# Altium PCB ADM32F036A2Q_BLDC_Demo_Rev1.0.pcbdoc (part 1 of 2)
Units mm, origin at the board's own origin, x right, y up, seen from the top; angles counter-clockwise.
Board outline 100 x 60 mm, 4 copper layers (Top Layer, S1, S2, Bottom Layer), stack 0.778 mm thick; 149 components, 80 nets, 408 pads, 387 vias.
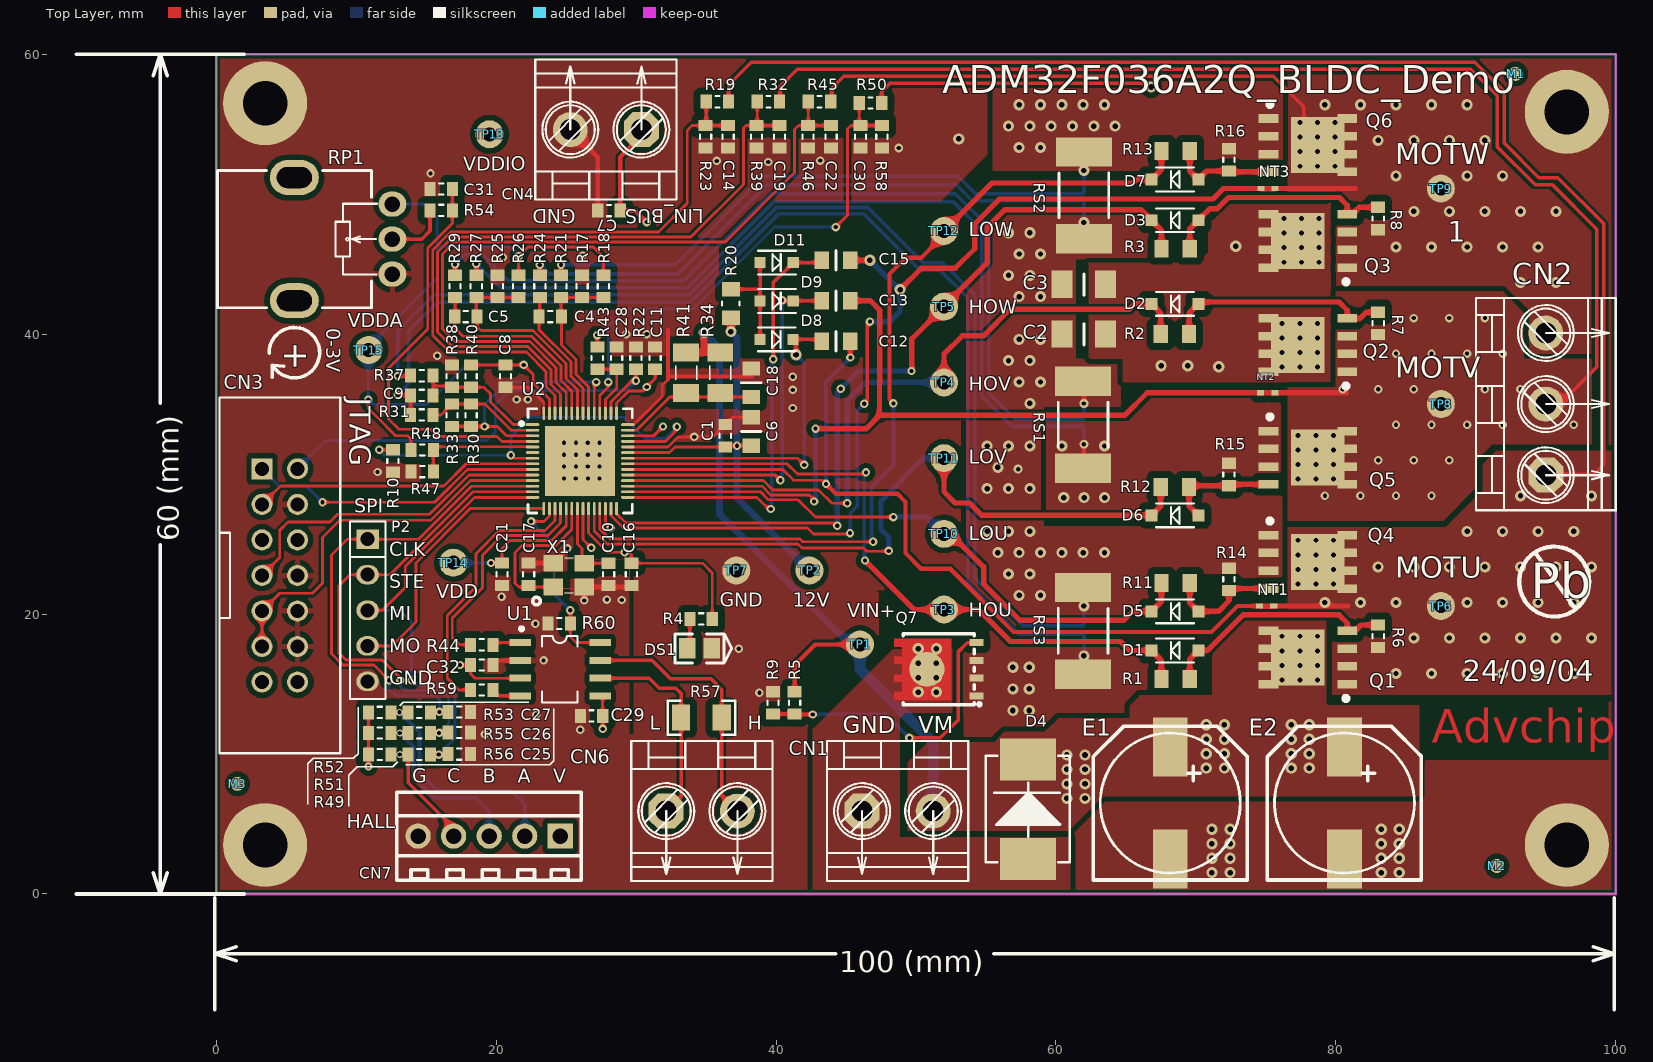
[diagram p0: Top Layer view]
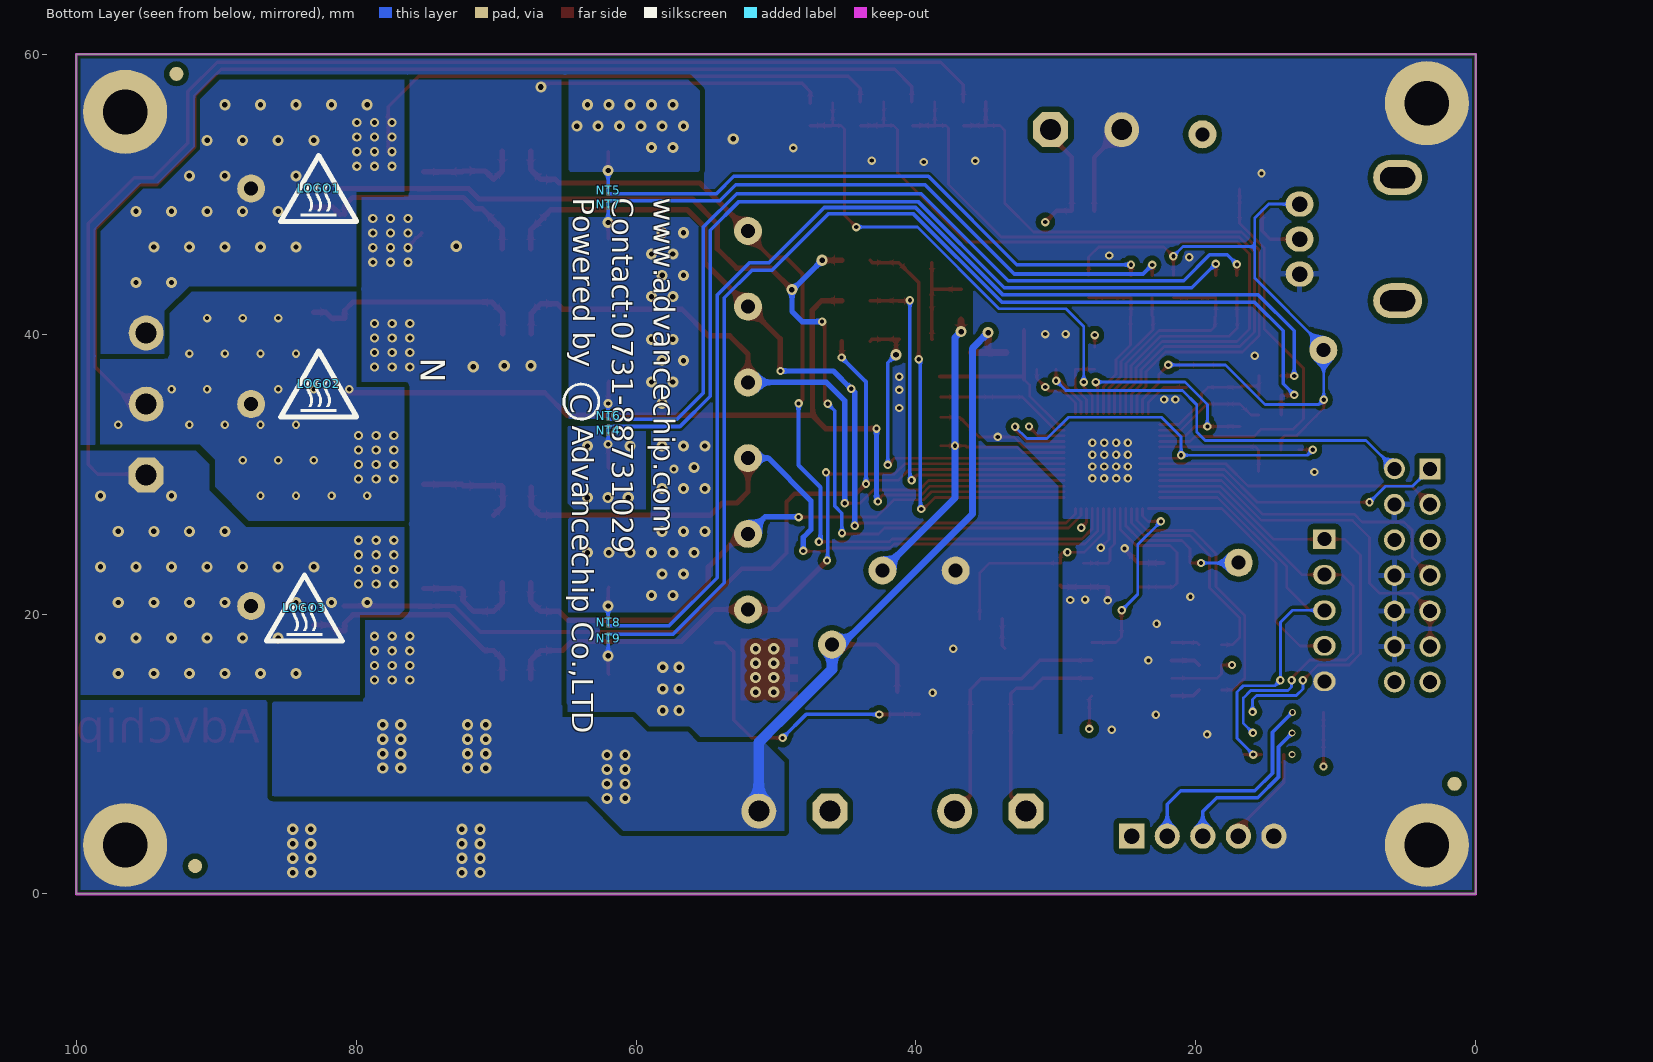
[diagram p1: Bottom Layer view, seen from below]
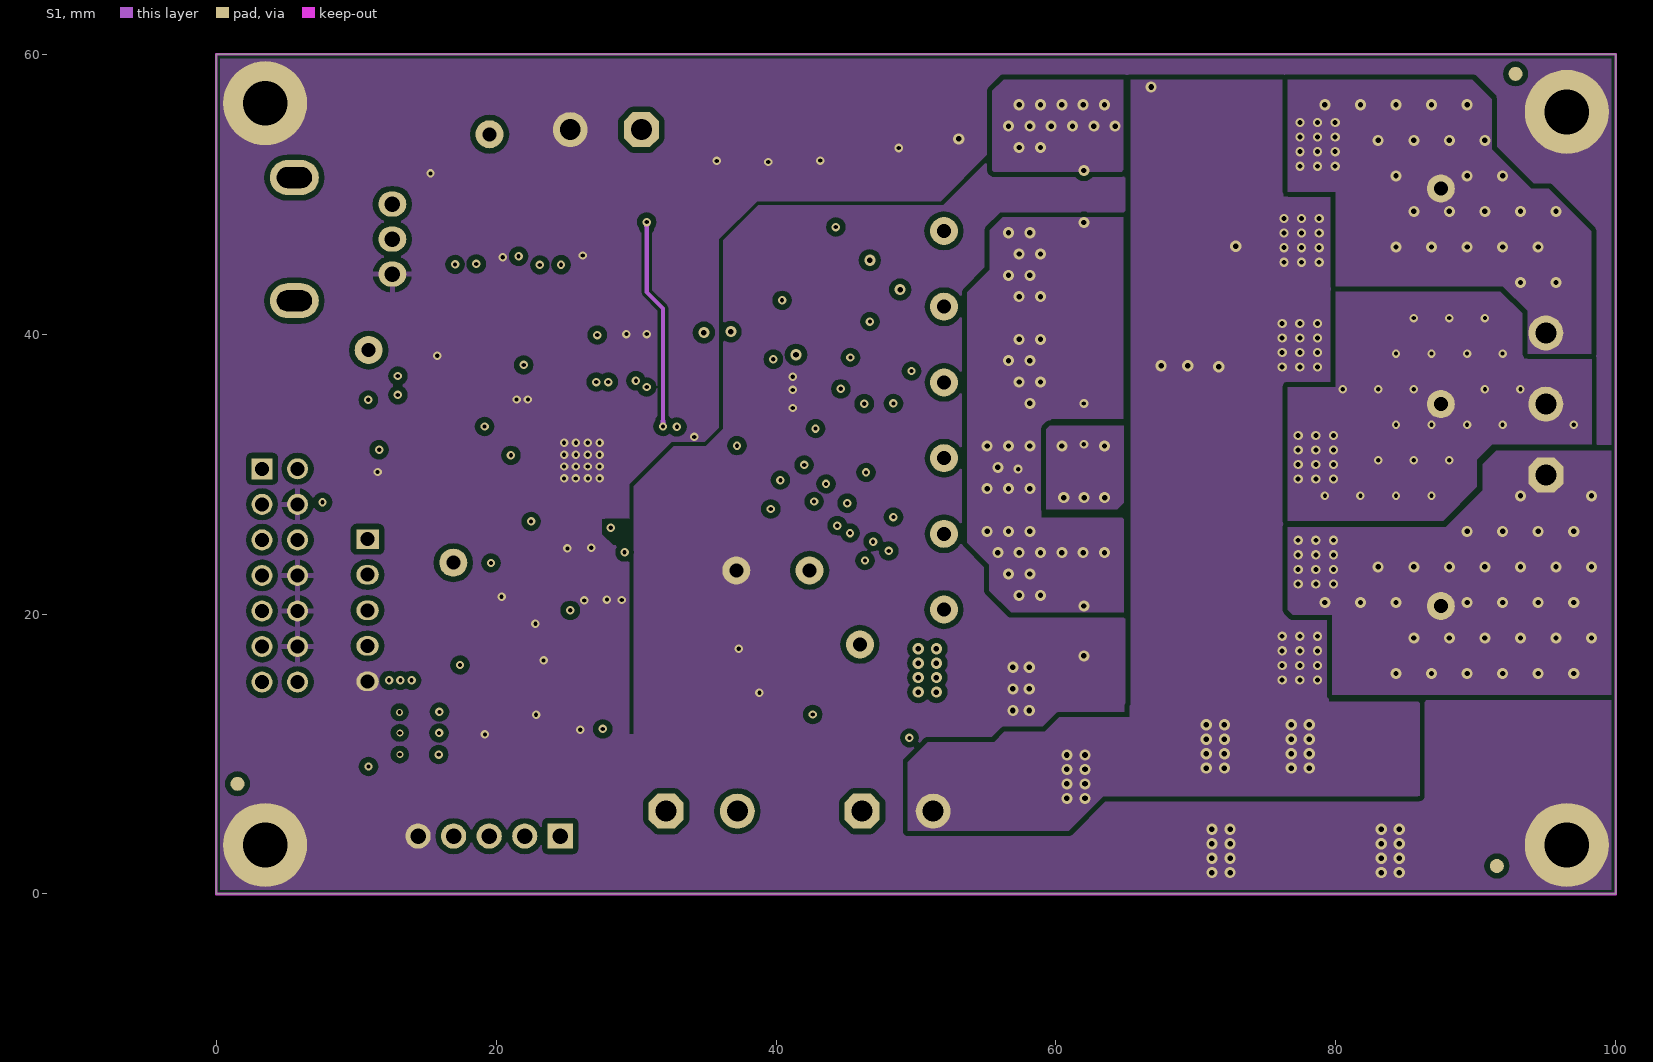
[diagram p2: S1]
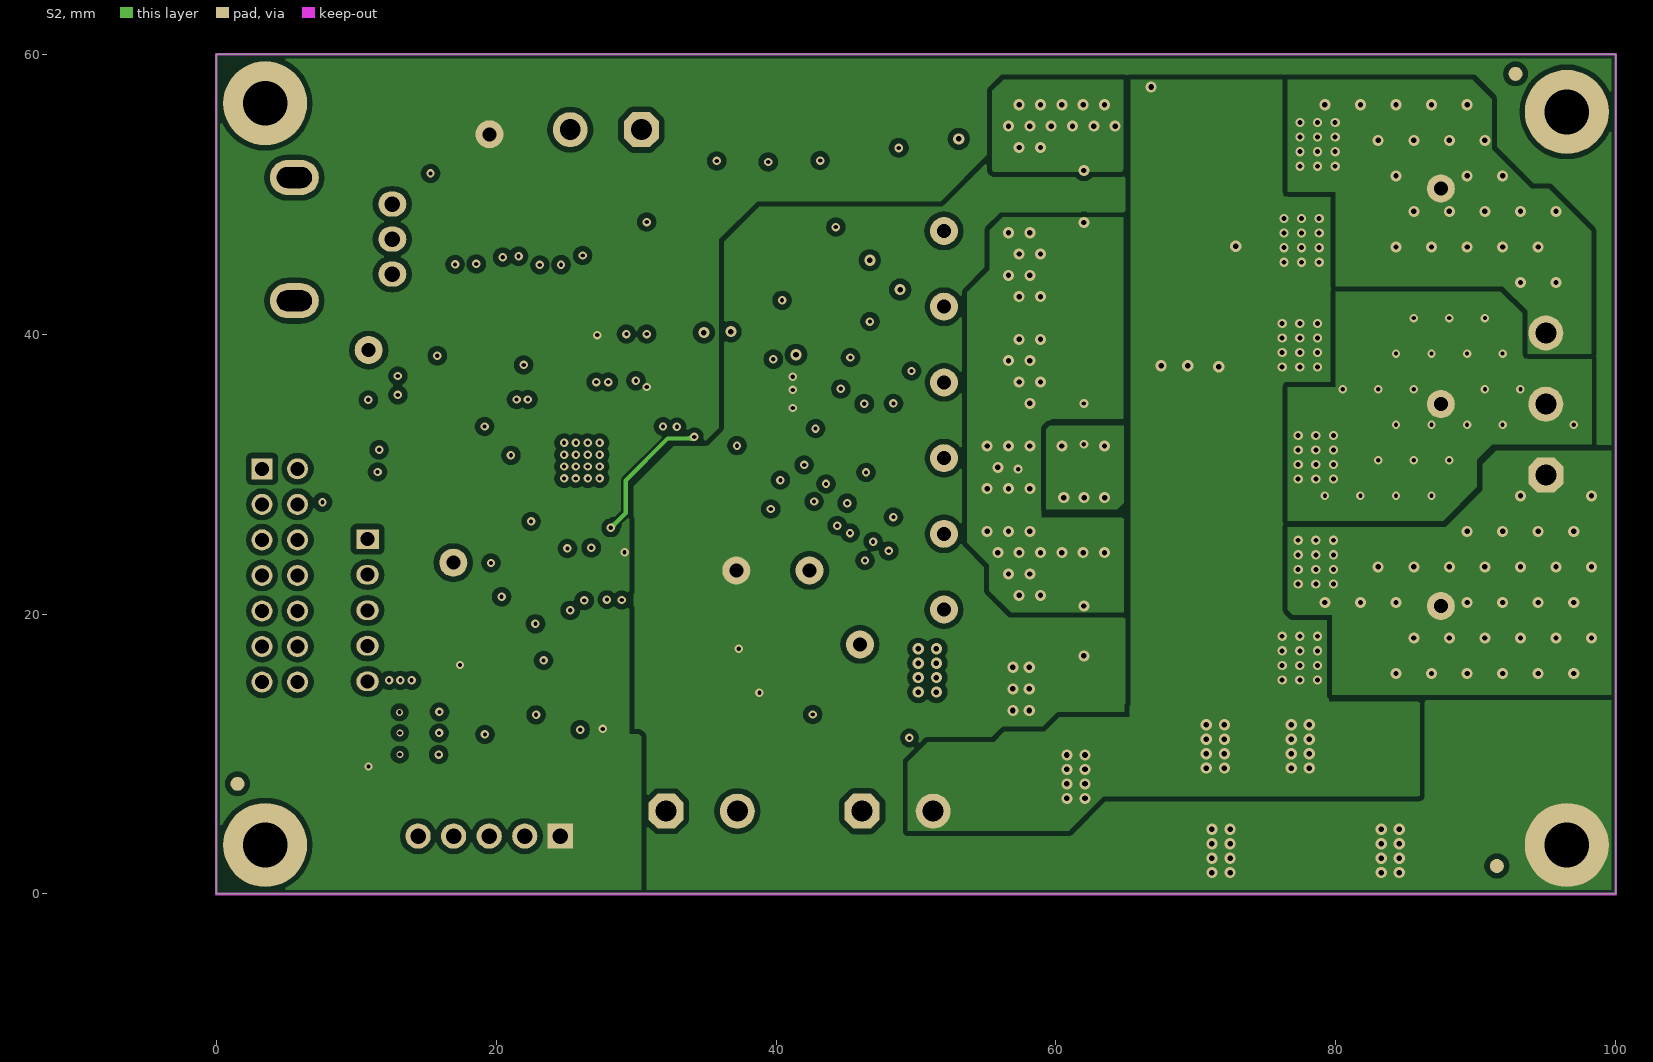
[diagram p3: S2]
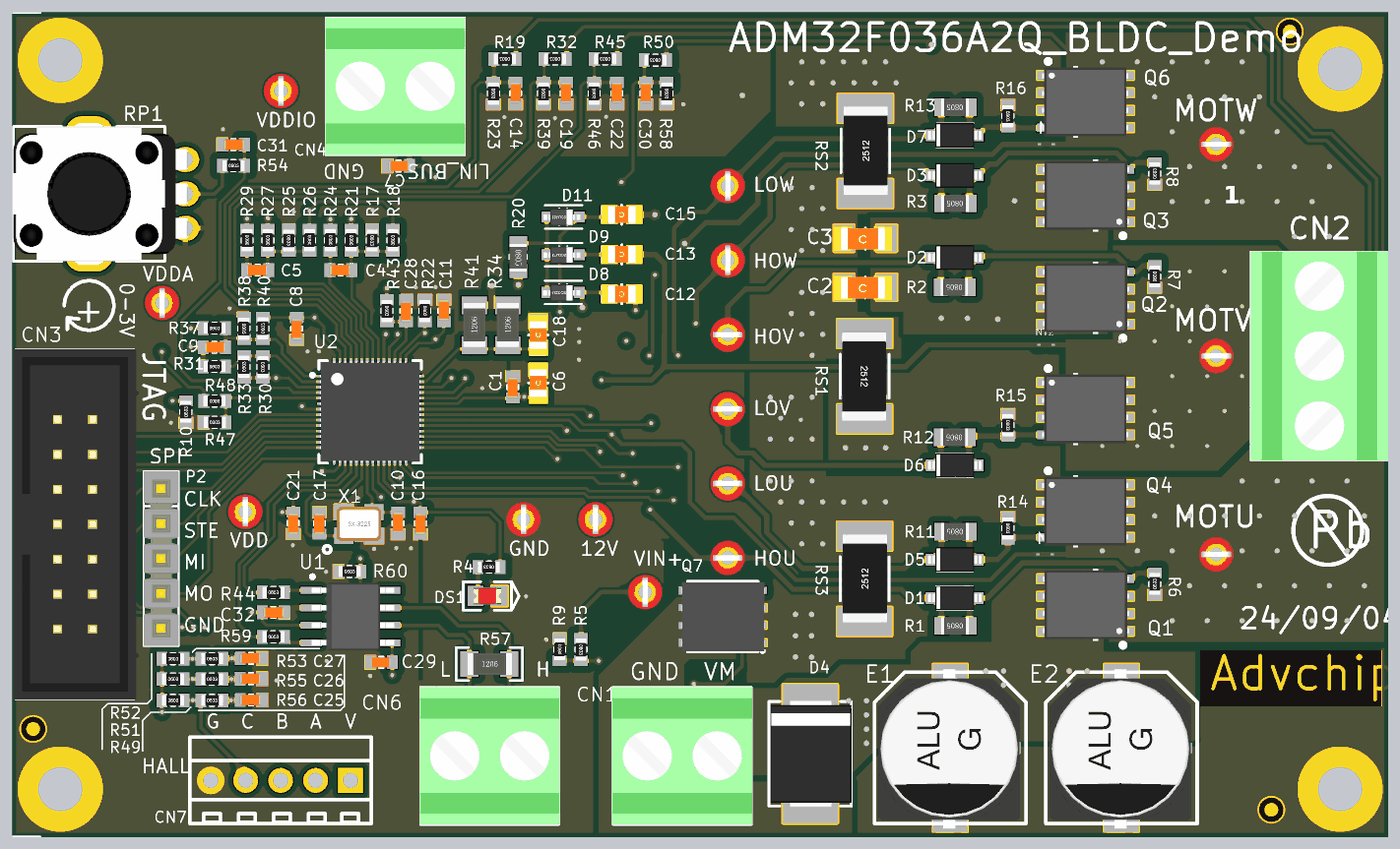
[diagram p5: 3D render of the assembled board from above, using the file's embedded part models]
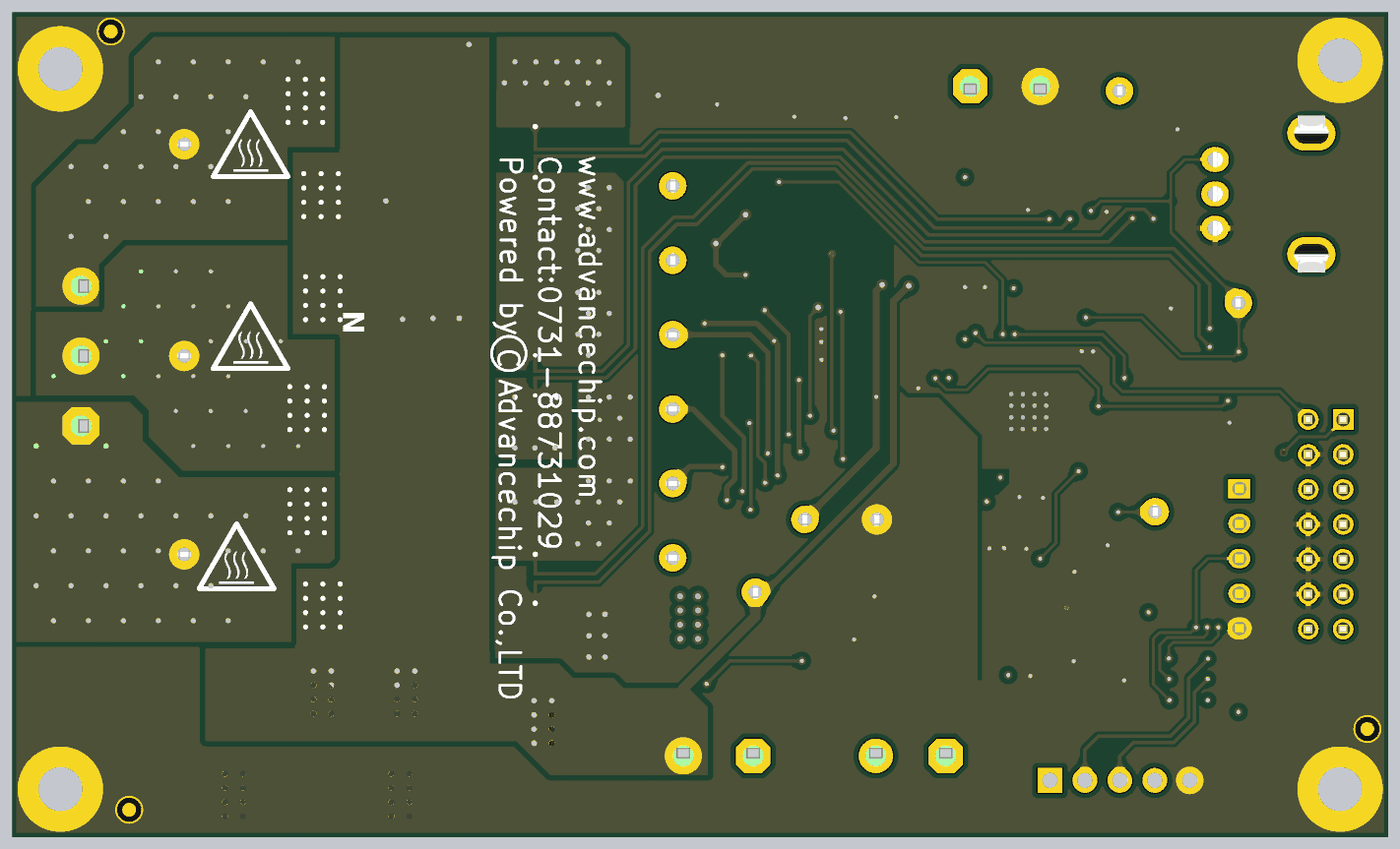
[diagram p6: 3D render of the assembled board from below, using the file's embedded part models]

## Layer stack, top to bottom
Top Solder: solder mask 0.0102, Solder Resist, Dk 3.5
Top Layer: signal copper 0.0356
Dielectric 1: core 0.254, FR-4, Dk 4.2
S1: signal copper 0.036
Dielectric 3: prepreg 0.127, Dk 4.2
S2: signal copper 0.036
Dielectric 2: core 0.254, Dk 4.2
Bottom Layer: signal copper 0.0356
Bottom Solder: solder mask 0.0102, Solder Resist, Dk 3.5

## Board outline
0,0 100,0 100,60 0,60

## Design rules (kind name [scope] priority, off if disabled: settings)
Clearance Clearance_U1 [InComponent('U1')] p1: gap=0.152 ignorepadtopadclearanceinfootprint=FALSE except(0.381: SMDPad-Fill SMDPad-Poly SMDPad-Region)
Clearance Clearance_T1T2 [(InComponent('T1') OR InComponent('T2'))] p2: gap=0.152 ignorepadtopadclearanceinfootprint=FALSE except(0.254: SMDPad-Fill SMDPad-Poly SMDPad-Region)
Clearance [All] p3: gap=0.203 ignorepadtopadclearanceinfootprint=FALSE except(0.152: Arc-Arc Arc-Track Arc-SMDPad Track-Track Track-SMDPad SMDPad-SMDPad; 0.381: THPad-Fill THPad-Poly THPad-Region Via-Fill Via-Poly Via-Region Fill-Fill Fill-Poly Fill-Region Poly-Poly Poly-Region Region-Region; 0.508: SMDPad-Fill SMDPad-Poly SMDPad-Region)
HoleSize [All] p1: absolutevalues=TRUE maxlimit=20 minlimit=0.025 maxpercent=80.000 minpercent=20.000
MinimumSolderMaskSliver [All] p1: minsoldermaskwidth=0.025
PlaneClearance [All] p1: clearance=0.254
PlaneConnect [InNet('GND')] p1: planeconnectstyle=Relief reliefexpansion=0.508 reliefentries=4 reliefconductorwidth=0.254 reliefairgap=0.254
PolygonConnect PolygonConnect_PAD [(HasFootprint('J-DG128-5') OR HasFootprint('SIP8A') OR HasFootprint('IDC14-L') OR HasFootprint('SIP6A') OR HasFootprint('SO-8') OR HasFootprint('SIP3A') OR HasFootprint('RK09K1130'))] p1: thpad.connectstyle=Relief thpad.reliefconductorwidth=0.381 thpad.reliefentries=4 thpad.polygonreliefangle="90 Angle" thpad.airgapwidth=0.381 smdpad.connectstyle=Relief smdpad.reliefconductorwidth=0.381 smdpad.reliefentries=4 smdpad.polygonreliefangle="90 Angle" smdpad.airgapwidth=0.381 via.connectstyle=Direct via.reliefconductorwidth=0.254 via.reliefentries=4 via.polygonreliefangle="90 Angle" via.airgapwidth=0.254
PolygonConnect [All] p2: connectstyle=Direct reliefconductorwidth=0.254 reliefentries=4 polygonreliefangle="90 Angle" airgapwidth=0.254
RoutingVias [All] p1: holewidth=0.711 width=1.27 viastyle="Through Hole" minholewidth=0.3 minwidth=0.6 maxholewidth=0.711 maxwidth=1.27
SilkToBoardRegionClearance [All] p1 off:
SilkToSilkClearance [All] p1 off: silktosilkclearance=0.254
SilkToSolderMaskClearance [IsPad] p1 off: minsilkscreentomaskgap=0.254 clearancetoexposedcopper=TRUE
SolderMaskExpansion [All] p1: expansion=0.102
Width [All] p1: maxlimit=25.4 minlimit=0.2 preferedwidth=0.2 minimp=50.000000 maximp=50.000000 favimp=50.000000
23 further rules are at their usual default settings.

## Components (designator, comment, footprint, x,y, rotation, side; value= is the part's Value field where it differs from the comment)
C1 "0.1uF/50V" C0603 36.373,32.741 r270 top value="TDK C3216X7R1V106KT000E"
C2 "1uF/50V" C1206 62,40.005 r180 top value=1uF
C3 "1uF/50V" C1206 62,43.561 r180 top value=1uF
C4 "NC" C0603 23.876,41.25 r180 top
C5 "NC" C0603 17.844,41.25 r180 top
C6 "10uF/50V" C0805 38.227,33.045 r90 top
C7 "100pF" C0603 28.067,48.819 r0 top
C8 "2.2uF/25V" C0603 20.676,36.999 r270 top value=2.2uF
C9 "100pF/50V" C0603 14.693,35.63 r0 top
C10 "22pF/50V" C0603 28.042,22.835 r90 top value=100pF
C11 "2.2uF/25V" C0603 31.369,38.289 r90 top value=2.2uF
C12 "2.2uF/50V" C0805 44.291,39.497 r180 top
C13 "2.2uF/50V" C0805 44.291,42.386 r180 top
C14 "47nF/25V" C0603 36.576,54.102 r90 top value=47nF
C15 "2.2uF/50V" C0805 44.291,45.276 r180 top
C16 "2.2uF/25V" C0603 29.667,22.835 r270 top value=2.2uF
C17 "22pF/50V" C0603 22.327,22.847 r270 top value=100pF
C18 "10uF/50V" C0805 38.227,36.525 r90 top
C19 "47nF/25V" C0603 40.246,54.102 r90 top value=47nF
C21 "2.2uF/25V" C0603 20.422,22.847 r270 top value=2.2uF
C22 "47nF/25V" C0603 43.942,54.102 r90 top value=47nF
C25 "10nF/50V" C0603 17.361,9.986 r180 top
C26 "10nF/50V" C0603 17.361,11.532 r180 top
C27 "10nF/50V" C0603 17.361,13.007 r180 top
C28 "0.1uF/50V" C0603 28.609,38.289 r270 top value="TDK C3216X7R1V106KT000E"
C29 "0.1uF/50V" C0603 26.822,12.725 r180 top value=0.1uF
C30 "0.1uF/50V" C0603 46.041,54.102 r90 top
C31 "0.1uF/50V" C0603 16.078,50.368 r0 top value="TDK C3216X7R1V106KT000E"
C32 "0.1uF/50V" C0603 18.974,16.358 r0 top value=0.1uF
CN1 "EK508V-02P" J-EK508V-02P 48.692,5.918 r0 top
CN2 "EK508V-03P" J-EK508V-03P 95,35 r90 top
CN3 "2.54-2X7P" IDC14-L 4.547,22.758 r270 top
CN4 "EK508V-02P" J-EK508V-02P_1 27.838,54.61 r180 top
CN6 "EK508V-02P" J-EK508V-02P 34.696,5.918 r0 top
CN7 "J-DG128-5" DB125-2.54-5P 19.507,4.135 r180 top
D1 "1N4148W" sod-123 68.5,17.399 r180 top
D2 "1N4148W" sod-123 68.5,42.164 r180 top
D3 "1N4148W" sod-123 68.5,48.133 r180 top
D4 "SMCJ26CA" SMC 57.988,6.071 r270 top
D5 "1N4148W" sod-123 68.5,20.193 r180 top
D6 "1N4148W" sod-123 68.5,27.051 r180 top
D7 "1N4148W" sod-123 68.5,51.054 r180 top
D8 "1N4148WS" SOD-323 40.03,39.624 r180 top
D9 "1N4148WS" SOD-323 40.044,42.367 r180 top
D11 "1N4148WS" SOD-323 40.044,45.11 r180 top
DS1 "绿色LED" SMD_LED0805_LED 34.535,17.545 r180 top
E1 "100uF/50V" CAP_SMD10*10 68.167,6.5 r270 top
E2 "100uF/50V" CAP_SMD10*10 80.613,6.5 r270 top
LOGO1 "CAUTION HOT SURFACE" IEC_HotSurface_Small 82.677,50.419 r180 bottom
LOGO2 "CAUTION HOT SURFACE" IEC_HotSurface_Small 82.677,36.449 r180 bottom
LOGO3 "CAUTION HOT SURFACE" IEC_HotSurface_Small 83.693,20.447 r180 bottom
M1 "" Mark1 92.837,58.598 r0 top
M2 "" Mark1 91.5,2 r0 top
M3 "" Mark1 1.524,7.874 r0 top
NT1 "Net-Tie" Net-Tie_15mil 75.057,20.574 r0 top net-tie
NT2 "Net-Tie" Net-Tie_15mil 75.133,35.814 r0 top net-tie
NT3 "Net-Tie" Net-Tie_15mil 75.152,50.4 r0 top net-tie
NT4 "Net-Tie" Net-Tie_10mil#1 62.001,33.147 r270 bottom net-tie
NT5 "Net-Tie" Net-Tie_10mil#1 62,50.292 r90 bottom net-tie
NT6 "Net-Tie" Net-Tie_10mil#2 62.001,34.163 r270 bottom net-tie
NT7 "Net-Tie" Net-Tie_10mil#1 62,49.276 r270 bottom net-tie
NT8 "Net-Tie" Net-Tie_10mil#1 62,19.431 r90 bottom net-tie
NT9 "Net-Tie" Net-Tie_10mil#1 62,18.288 r270 bottom net-tie
P2 "XH2.54-5P母座" SIP5 10.82,25.349 r270 top
Q1 "AD65N10" "POWER 56" 78,16.891 r90 bottom
Q2 "AD65N10" "POWER 56" 78,39.219 r90 bottom
Q3 "AD65N10" "POWER 56" 78,46.662 r90 bottom
Q4 "AD65N10" "POWER 56" 78,23.729 r270 bottom
Q5 "AD65N10" "POWER 56" 78,31.172 r270 bottom
Q6 "AD65N10" "POWER 56" 78,53.5 r270 bottom
Q7 "YJG150N03A" DFN5*6 52.556,16.053 r90 top
R1 "22R" R0805 68.548,15.367 r180 top value=1K
R2 "22R" R0805 68.5,40.005 r180 top value=1K
R3 "22R" R0805 68.548,46.101 r180 top value=1K
R4 "4.7KΩ" R0603 34.648,19.653 r180 top value=1K
R5 "10KΩ" R0603 41.335,13.655 r270 top value=1K
R6 "10KΩ" R0603 83.026,18.415 r90 top
R7 "10KΩ" R0603 83.026,40.767 r90 top
R8 "10KΩ" R0603 83.026,48.26 r90 top
R9 "100KΩ" R0603 39.786,13.655 r90 top value=1K
R10 "2.2K" R0603 12.624,30.937 r90 top
R11 "22R" R0805 68.548,22.225 r180 top value=1K
R12 "22R" R0805 68.5,29.083 r180 top value=1K
R13 "22R" R0805 68.548,53.086 r180 top value=1K
R14 "10KΩ" R0603 72.358,22.479 r270 top
R15 "10KΩ" R0603 72.358,29.972 r270 top
R16 "10KΩ" R0603 72.358,52.451 r270 top
R17 "18K" R0603 26.153,43.411 r270 top value=1K
R18 "18K" R0603 27.667,43.411 r90 top value=1K
R19 "150KΩ 1%" R0603 35.814,56.604 r180 top
R20 "20R" R0805 36.779,42.189 r270 top
R21 "3K" R0603 24.639,43.411 r90 top value=1K
R22 "2.2KΩ" R0603 29.989,38.289 r270 top value=1K
R23 "10KΩ 1%" R0603 34.97,54.102 r270 top
R24 "0R" R0603 23.125,43.411 r90 top value=1K
R25 "18K" R0603 20.097,43.411 r270 top value=1K
R26 "18K" R0603 21.611,43.411 r90 top value=1K
R27 "3K" R0603 18.583,43.411 r90 top value=1K
R29 "0R" R0603 17.069,43.411 r90 top value=1K
R30 "100KΩ" R0603 18.217,34.205 r270 top value=1K
R31 "1KΩ" R0603 14.693,34.233 r0 top value=1K
R32 "150KΩ 1%" R0603 39.459,56.604 r180 top
R33 "10KΩ" R0603 16.845,34.205 r90 top value=1K
R34 "0R" R1206 36.017,37.236 r90 top
R37 "1KΩ" R0603 14.693,37.027 r0 top value=1K
R38 "10KΩ" R0603 16.845,36.999 r270 top value=1K
R39 "10KΩ 1%" R0603 38.608,54.102 r270 top
R40 "100KΩ" R0603 18.217,36.999 r90 top value=1K
R41 "0R" R1206 33.579,37.236 r90 top
R43 "10K" R0603 27.229,38.289 r270 top
R44 "100R" R0603 18.974,17.805 r0 top
R45 "150KΩ 1%" R0603 43.105,56.604 r180 top
R46 "10KΩ 1%" R0603 42.291,54.102 r270 top
R47 "NC" R0603 14.718,30.175 r0 top value=1K
R48 "NC" R0603 14.718,31.725 r180 top value=1K
R49 "4.7KΩ" R0603 11.684,9.96 r0 top value=1K
R50 "150KΩ 1%" R0603 46.75,56.515 r180 top
R51 "4.7KΩ" R0603 11.684,11.506 r0 top value=1K
R52 "4.7KΩ" R0603 11.684,12.982 r0 top value=1K
R53 "1KΩ" R0603 14.516,12.982 r0 top value=1K
R54 "1KΩ" R0603 16.078,48.844 r0 top value=1K
R55 "1KΩ" R0603 14.516,11.506 r0 top value=1K
R56 "1KΩ" R0603 14.516,9.96 r0 top value=1K
R57 "120R" 1206RX 34.671,12.598 r0 top
R58 "10KΩ 1%" R0603 47.565,54.102 r270 top
R59 "100R" R0603 18.974,14.58 r0 top
R60 "10K" R0603 24.511,19.329 r0 top value=1K
RP1 "RK09K1130AAU  50KΩ" RK09K1130 5.588,46.787 r90 top
RS1 "50mΩ/3W" R2512 61.944,33.528 r90 top value=1K
RS2 "50mΩ/3W" R2512 62,49.911 r270 top value=1K
RS3 "5mΩ/3W" R2512 61.944,18.796 r270 top value=1K
TP1 "VIN+" TP-5000-RED 45.999,17.831 r0 top
TP2 "12V" TP-5000-RED 42.393,23.114 r0 top
TP3 "HOU" TP-5000-RED 52,20.32 r90 top
TP4 "HOV" TP-5000-RED 52,36.551 r90 top
TP5 "HOW" TP-5000-RED 52,41.961 r0 top
TP6 "MOTU" TP-5000-RED 87.5,20.574 r90 top
TP7 "GND" TP-5000-RED 37.16,23.114 r0 top
TP8 "MOTV" TP-5000-RED 87.5,35 r90 top
TP9 "MOTW" TP-5000-RED 87.5,50.4 r90 top
TP10 "LOU" TP-5000-RED 52,25.73 r90 top
TP11 "LOV" TP-5000-RED 52,31.14 r90 top
TP12 "LOW" TP-5000-RED 52,47.371 r0 top
TP13 "VDDIO" TP-5000-RED 19.533,54.28 r0 top
TP14 "VDD" TP-5000-RED 16.942,23.673 r0 top
TP15 "VDDA" TP-5000-RED 10.897,38.862 r0 top
U1 "MCP2562FD-E/SN" SO-8 24.587,16.053 r270 top
U2 "ADM32F036A2Q" QFN56-7X7-04P 26.01,30.937 r0 top
X1 "10MHz" XTAL_3225 25.197,22.784 r0 top

## Footprints (in the part's own frame and the unit in brackets; to place one, negate y for a bottom-side part, rotate by r counter-clockwise, add the part's x,y. Pads: shape width x height; smd on the part's side, far side on the other; paste and mask are expansions set on the pad)
1206RX [mm]
  rect 1.3x1.85 smd: 1(-1.45,0) 2(1.45,0)
  silkscreen extent -2.4,-1.21 2.4,1.21, body extent -1.57,-0.8 1.63,0.8, height 0.6
C0603 [mm]
  rect 0.8x1 smd mask+0.051: 1(-0.8,0) 2(0.8,0)
  silkscreen extent -0.15,-0.4 0.15,0.4, body extent -0.71,-0.38 0.81,0.38, height 0.68
C0805 [mil]
  rect 40x50 smd: 1(-40,0) 2(40,0)
  silkscreen extent 0,-28 0,28, body extent -59,-28 59,27, height 37
C1206 [mm]
  rect 1.5x1.95 smd: 1(-1.55,0) 2(1.55,0)
  silkscreen extent 0,-0.74 0,0.79, body extent -1.92,-0.86 2.28,0.94, height 0.95
CAP_SMD10*10 [mm] "10*10"
  rect 4.2x2.5 smd: 1(-4,0) 2(4,0)
  silkscreen extent -5.5,-5.5 5.5,5.5, body extent -5.72,-5.23 5.88,5.07, height 10.2
DB125-2.54-5P [mm]
  rect 1.8x1.8 hole 1.1: 1(-5.08,0)
  round 1.8 hole 1.1: 2(-2.54,0) 3(0,0) 4(2.54,0) 5(5.08,0)
  silkscreen extent -6.59,-3.14 6.59,3.14
DFN5*6 [mm] "USED for CTN04PN035"
  rect 0.498x1.001 smd: 1(1.905,-1.775) 2(-1.905,-1.775) 2(-0.635,-1.775) 2(0.635,-1.775)
  round 2.5 smd: 3(0,1.775)
  Top Layer region: -2.2,0.025 -2.2,4.125 -1.6,4.125 -1.6,3.525 -0.9,3.525 -0.9,4.125 -0.4,4.125 -0.4,3.525 0.4,3.525 0.4,4.125 0.9,4.125 0.9,3.525 1.6,3.525 1.6,4.125 2.2,4.125 2.2,0.025
  silkscreen extent -2.6,-2.08 2.54,3.47, body extent -2.53,-2.16 2.47,3.94, height 0.95
IDC14-L [mm]
  rect 1.5x1.5 hole 1: 1(-7.62,-1.27)
  round 1.5 hole 1: 2(-7.62,1.27) 3(-5.08,-1.27) 4(-5.08,1.27) 5(-2.54,-1.27) 6(-2.54,1.27) 7(0,-1.27) 8(0,1.27) 9(2.54,-1.27) 10(2.54,1.27) 11(5.08,-1.27) 12(5.08,1.27) 13(7.62,-1.27) 14(7.62,1.27)
  silkscreen extent -12.7,-4.32 12.7,4.32, body extent -12.72,-4.44 12.72,4.67, height 9.1
IEC_HotSurface_Small [mm]
  silkscreen extent -2.72,-2.36 2.72,2.35
J-EK508V-02P [mm]
  oct 2.5x2.5 hole 1.5: 1(-2.54,0)
  round 2.5 hole 1.5: 2(2.54,0)
  silkscreen extent -5.04,-5 5.04,5, body extent -5.08,-5 5.08,5, height 13.8
J-EK508V-02P_1 [mm]
  oct 2.5x2.5 hole 1.5: 1(-2.54,0)
  round 2.5 hole 1.5: 2(2.54,0)
  silkscreen extent -5.04,-5 5.04,5, body extent -5.08,-5 5.08,5, height 13.8
J-EK508V-03P [mm]
  oct 2.5x2.5 hole 1.5: 1(-5.08,0)
  round 2.5 hole 1.5: 2(0,0) 3(5.08,0)
  silkscreen extent -7.58,-5 7.58,5, body extent -7.62,-5 7.62,5, height 13.8
Mark1 [mm] "基准点 无边框"
  round 1 all layers, no hole: 0(0,0)
Net-Tie_10mil#1 [mil] "10mil net tie, no solder mask opening, no solder paste"
  rect 10x10 smd paste-5 mask-5: 1(-10,0) 2(10,0)
  Top Layer region: -6,5 6,5 6,-5 -6,-5
Net-Tie_10mil#2 [mil]
  rect 10x10 smd paste-5 mask-5: 1(10,0) 2(-10,0)
  Top Layer region: 6,-5 -6,-5 -6,5 6,5
Net-Tie_15mil [mil] "网络连接点"
  rect 20x15 smd paste-5 mask-5: 1(-20,0) 2(20,0)
  Top Layer region: -20,7 20,7 20,-7 -20,-7
"POWER 56" [mm]
  rect 0.61x1.4 smd far side: 1(-1.905,2.816) 2(-0.635,2.816) 3(0.635,2.816) 4(1.905,2.816) 5(1.905,-2.816) 6(0.635,-2.816) 7(-0.635,-2.816) 8(-1.905,-2.816)
  rect 4x3.81 smd far side: 9(0,-0.716)
  body extent -2.61,-3.1 2.64,3.14, height 1.09
QFN56-7X7-04P [mm]
  rect 5x5 smd mask+0.051: 0(0,0)
  oval 0.95x0.2 smd mask+0.051: 1(-3.4,2.6) 2(-3.4,2.2) 3(-3.4,1.8) 4(-3.4,1.4) 5(-3.4,1) 6(-3.4,0.6) 7(-3.4,0.2) 8(-3.4,-0.2) 9(-3.4,-0.6) 10(-3.4,-1) 11(-3.4,-1.4) 12(-3.4,-1.8) 13(-3.4,-2.2) 14(-3.4,-2.6) 29(3.4,-2.6) 30(3.4,-2.2) 31(3.4,-1.8) 32(3.4,-1.4) 33(3.4,-1) 34(3.4,-0.6) 35(3.4,-0.2) 36(3.4,0.2) 37(3.4,0.6) 38(3.4,1) 39(3.4,1.4) 40(3.4,1.8) 41(3.4,2.2) 42(3.4,2.6)
  oval 0.2x0.95 smd mask+0.051: 15(-2.6,-3.4) 16(-2.2,-3.4) 17(-1.8,-3.4) 18(-1.4,-3.4) 19(-1,-3.4) 20(-0.6,-3.4) 21(-0.2,-3.4) 22(0.2,-3.4) 23(0.6,-3.4) 24(1,-3.4) 25(1.4,-3.4) 26(1.8,-3.4) 27(2.2,-3.4) 28(2.6,-3.4) 43(2.6,3.4) 44(2.2,3.4) 45(1.8,3.4) 46(1.4,3.4) 47(1,3.4) 48(0.6,3.4) 49(0.2,3.4) 50(-0.2,3.4) 51(-0.6,3.4) 52(-1,3.4) 53(-1.4,3.4) 54(-1.8,3.4) 55(-2.2,3.4) 56(-2.6,3.4)
  silkscreen extent -4.32,-3.72 3.73,3.73, body extent -3.65,-3.65 3.66,3.66, height 1
R0603 [mm] "无丝印 脚距1.6mm  0.8/1mm 焊盘"
  rect 0.8x1 smd mask+0.051: 1(-0.8,0) 2(0.8,0)
  silkscreen extent -0.15,-0.4 0.15,0.4, body extent -0.79,-0.4 0.81,0.4, height 0.43
R0805 [mil] "标准型  间距40mil"
  rect 40x50 smd: 1(-40,0) 2(40,0)
  body extent -38,-25 41,25, height 22
R1206 [mm]
  rect 1.3x1.85 smd: 1(-1.45,0) 2(1.45,0)
  silkscreen extent -0.5,-0.75 0.5,0.75, body extent -1.57,-0.8 1.63,0.8, height 0.6
R2512 [mm] "SMD, 2-Leads, Body 6.45x3.35mm, Pitch 6.2mm"
  rect 2.1x4 smd: 1(3.1,0) 2(-3.1,0)
  silkscreen extent -1.6,-1.78 1.6,1.78, body extent -3.23,-1.57 3.17,1.63, height 0.6
RK09K1130 [mm] "立式可调电位器"
  oval 2.5x3.5 hole 1.5 slot 2.5 at 90 deg: 0(-4.4,0) 0(4.4,0)
  oval 1.8x2 hole 1.1: 1(-2.5,-7) 2(0,-7) 3(2.5,-7)
  silkscreen extent -4.9,-5.88 4.9,5.5, body extent -5.7,-7.15 5.7,5.5, height 19.5
SIP5 [mm]
  rect 1.4x1.6 hole 1: 1(0,0)
  oval 1.4x1.6 hole 1: 2(2.54,0) 3(5.08,0) 4(7.62,0) 5(10.16,0)
  silkscreen extent -1.27,-1.27 11.43,1.27, body extent -1.27,-1.27 11.43,1.27, height 8.89
SMC [mm]
  rect 3x4 smd: 1(3.555,0) 2(-3.555,0)
  silkscreen extent -3.8,-3 3.8,3, body extent -3.9,-2.9 3.9,3, height 2.4
SMD_LED0805_LED [mm]
  rect 1.16x1.47 smd: 1(0.875,0) 2(-0.875,0)
  silkscreen extent -2.3,-1.04 1.76,1.03, body extent -1.01,-0.62 1.01,0.62, height 1.1
SO-8 [mil]
  rect 20x60 smd: 1(-75,-112.5) 2(-25,-112.5) 3(25,-112.5) 4(75,-112.5) 5(75,112.5) 6(25,112.5) 7(-25,112.5) 8(-75,112.5)
  silkscreen extent -119,-114 93,49, body extent -96,-111 96,125, height 64
sod-123 [mm]
  rect 0.85x0.85 smd: 1(-1.675,0) 2(1.675,0)
  silkscreen extent -1.35,-0.85 1.35,0.85, body extent -1.95,-0.9 1.95,0.9, height 1.18
SOD-323 [mm]
  rect 0.8x0.8 smd: A(1.18,0) K(-1.18,0)
  silkscreen extent -1.38,-0.85 1.32,0.85, body extent -1.25,-0.6 1.45,0.65, height 1.1
TP-5000-RED [mm] "KEYSTONE红色测试点"
  round 2 hole 1: 1(0,0)
  body extent -1.27,-1.27 1.27,1.27, height 4.89
XTAL_3225 [mm] "3225晶振"
  rect 1.4x1.2 smd mask+0.051: 1(-1.1,-0.85) 2(1.1,-0.85) 3(1.1,0.85) 4(-1.1,0.85)
  silkscreen extent -2.58,-2.12 0.3,1.25, body extent -1.6,-1.25 1.6,1.25, height 0.81

## Part data
C1 C2 C3 C4 C5 C6 C8 C9 C11 C14 C16 C18 C19 C21 C22 C25 C26 C27 C28 C29 C30 C31 C32: library part Cap, "贴片电容", LatestRevisionDate=17-Jul-2002, LatestRevisionNote="Re-released for DXP Platform.", Published=8-Jun-2000, Publisher="Altium Limited"
C7: library part CAP
C10 C17: library part Cap, "COG贴片电容", LatestRevisionDate=17-Jul-2002, LatestRevisionNote="Re-released for DXP Platform.", Published=8-Jun-2000, Publisher="Altium Limited"
C12 C13 C15: library part CAP-CC(SMD), "贴片电容"
CN1 CN4 CN6: library part CON2A, "连接器"
CN2: library part Motor2, "连接器", LatestRevisionDate=17-Jul-2002, LatestRevisionNote="Re-released for DXP Platform.", Published=24-Mar-1999, Publisher="Altium Limited"
CN3: library part Receptacle_7X2, "简易牛角座连接器 卧式"
CN7: library part CMP-0055532-1, "连接器"
D1 D2 D3 D5 D6 D7: library part M7, "二极管", PackageDocument=Aug-1999, Code_JEDEC=DO-204-AL, DatasheetDocument=1998, LatestRevisionDate=17-Jul-2002, LatestRevisionNote="Re-released for DXP Platform.", PackageReference=DO-41, Published=8-Jun-2000, Publisher="Altium Limited"
D4: library part TVS, "TVS二极管", LatestRevisionDate=17-Jul-2002, LatestRevisionNote="Re-released for DXP Platform.", Published=8-Jun-2000, Publisher="Altium Limited"
D8 D9 D11: library part 1N4004, "二极管"
DS1: library part LED0, "LED", LatestRevisionDate=08-Jul-2005, LatestRevisionNote="Mech Layer 1 removed.", PackageDescription="LED; 2 Leads", PackageReference=LED-0, Published=8-Jun-2000, Publisher="Altium Limited"
E1 E2: library part CMP-0011224-2, "贴片电解电容", PartNumber=EEETP1H102M
LOGO1 LOGO2 LOGO3: library part CMP-0074837-1, "IEC 61010-1 Hot Surface Warning", LatestRevisionDate=2017-07-06, Lib Reference=IEC_HotSurface, PartNumber="CAUTION HOT SURFACE", Published=2009-03-03, Publisher="Texas Instruments", SymbolCreator=a0412235, SymbolVersion=2011-08-22
M1 M2 M3: library part CMP-0077181-1, "MARK点"
NT1 NT2 NT3 NT4 NT5 NT6 NT7 NT8 NT9: library part CMP-0078142-1, "PCB网络短接点", Manufacturer=N/A, CompType=Net-Tie, MountType=SMT, PackageReference=N/A, PartNumber=N/A
P2: library part CON5, "连接器"
Q1 Q2 Q3 Q4 Q5 Q6: library part BSC190N15NS3G, "安德斯诺N-MOSFET  100V,6mR,65A"
  Q2 Q3 Q4 Q5 Q6: Code_JEDEC=TO-220-AB, DatasheetDocument=PD-9.814, LatestRevisionDate=17-Jul-2002, LatestRevisionNote="Re-released for DXP Platform.", Note="Pin 2 is electrically connected to pin 4.", PackageReference=TO-220AB, Published=8-Jun-2000, Publisher="Altium Limited"
Q7: library part NMOSFET, "N-MOSFET", Vth=0.8~1.5V, 替代料="AO3400A  0.7~1.4V"
R1 R2 R3 R4 R5 R6 R7 R8 R9 R10 R11 R12 R13 R14 R15 R16 R17 R18 R19 R21 R22 R23 R24 R25 R26 R27 R29 R30 R31 R32 R33 R34 R37 R38 R39 R40 R41 R45 R46 R47 R48 R49 R50 R51 R52 R53 R54 R55 R56 R57 R58 R60: library part Res, "贴片电阻", LatestRevisionDate=17-Jul-2002, LatestRevisionNote="Re-released for DXP Platform.", Published=8-Jun-2000, Publisher="Altium Limited"
R20: library part RES(SMD), "贴片电阻"
R43 R44 R59: library part 10K/1%, "------", Add into BOM=yes, Convert to PCB=yes, Design Item ID=Res, Device=10K/1%, LatestRevisionDate=17-Jul-2002, LatestRevisionNote="Re-released for DXP Platform.", Origin Footprint=0603R-X, Published=8-Jun-2000, Publisher="Altium Limited", Symbol=Res
  R43: Name=10K
  R44 R59: Name=1K
RP1: library part "RPot SM", "立式可调电位器", DatasheetDocument=Oct-2003, Published=17-Dec-2003, Publisher="Altium Limited"
RS1 RS2 RS3: library part Res, "贴片采样电阻", LatestRevisionDate=17-Jul-2002, LatestRevisionNote="Re-released for DXP Platform.", Published=8-Jun-2000, Publisher="Altium Limited"
TP1 TP2 TP3 TP4 TP5 TP6 TP7 TP8 TP9 TP10 TP11 TP12 TP13 TP14 TP15: library part TP, "测试点"
U1: library part SN65HVD230D, "3.3V CAN FDͨѶ"
U2: "进芯电机驱动专用芯片"
X1: library part 3TJ410000ZYLBC, "无源晶振", Equivalent Series Resistance (ESR)=150Ω, External load capacitor=20pF, Frequency Stability(Full temperature range)=±30ppm, JLCPCB Part Class="Extended Part", LCSC Part Name="10MHz ±10ppm 20pF", Manufacturer=JYJE(晶友嘉), Normal temperature Frequency Tolerance=±10ppm, Operating Temperature=-40℃~+85℃, Add into BOM=yes, Convert to PCB=yes, Crystal Type=贴片晶振, Datasheet=https://atta.szlcsc.com/upload/public/pdf/source/20210922/C2898998_79DA4CA19A36528DCEC4420D32E637EE.pdf, Device=3TJ410000ZYLBC, Manufacturer Part=3TJ410000ZYLBC, Name=10MHz, Supplier=LCSC, Supplier Footprint=SMD3225-4P, Supplier Part=C2898998, Symbol=3TJ410000ZYLBC

## Free pads (board coordinates)
  round 6 hole 3.2: 1(3.5,3.5) 1(3.5,56.5) 1(96.5,3.5) 1(96.5,55.88)

## Via types
v1: diameter 0.6, hole 0.3, Top Layer to Bottom Layer, tented both sides, 130 vias
v2: diameter 0.787, hole 0.381, Top Layer to Bottom Layer, tented both sides, 106 vias
v3: diameter 0.66, hole 0.356, Top Layer to Bottom Layer, tented bottom, 72 vias
v4: diameter 0.8, hole 0.4, Top Layer to Bottom Layer, tented both sides, 68 vias
v5: diameter 0.635, hole 0.305, Top Layer to Bottom Layer, tented both sides, 4 vias
v6: diameter 0.787, hole 0.381, Top Layer to Bottom Layer, tented bottom, 4 vias
v7: diameter 0.5, hole 0.3, Top Layer to Bottom Layer, tented both sides, 3 vias

## Nets (pads, with @x,y where several pads share a name; then routed paths per layer and width w, separated by ;. In a path a pad name is that pad's centre, name@x,y a point inside that pad or via, vN(x,y) a via of type N, cw(c..) or ccw(c..) an arc to the next point about the centre after c; other vN are vias at no path point)
+12VDC: C1.2 C6.1 R20.2 TP2.1 U2.37 | length 29.4
  Top Layer w0.203: U2.37@29.41,31.537 32.375,31.537 32.421,31.583 32.424,31.583 32.781,31.941 C1.2@36.373,31.941 36.462,32.029 C6.1@38.227,32.029 ; R20.2@36.779,40.97 R20.2@36.779,41.173
  Top Layer w0.5: v4(36.779,40.183) R20.2@36.779,40.97
  Bottom Layer w0.5: v4(36.779,40.183) 37.211,39.751 v1(37.211,32.029) 37.211,28.296 TP2.1@42.393,23.114
ADC_POT: C31.2 R54.2 U2.4 | length 29.3
  Top Layer w0.2: 13.05,33.21 15.329,33.21 15.85,32.69 20.066,32.69 20.419,32.337 U2.4@22.61,32.337
  Top Layer w0.203: 13.05,33.21 12.319,33.942 12.319,37.567 15.115,40.362 15.115,46.161 16.878,47.925 R54.2@16.878,48.844 C31.2@16.878,50.368
CAN_H: CN6.2 R57.2 U1.7 | length 18.7
  Top Layer w0.254: U1.7@27.445,16.688 31.14,16.688 32.461,15.367 35.357,15.367 36.121,14.603 R57.2@36.121,12.598 36.121,7.034 CN6.2@37.236,5.918
CAN_L: CN6.1 R57.1 U1.6 | length 15.1
  Top Layer w0.254: U1.6@27.445,15.418 30.937,15.418 31.648,14.707 32.842,14.707 33.221,14.328 R57.1@33.221,12.598 33.221,6.983 CN6.1@32.156,5.918
CANFDRX: R59.1 U2.17 | length 19.2
  Top Layer w0.203: R59.1@18.174,14.58 17.348,14.58 16.51,15.418 16.51,19.888 18.567,21.946 18.567,24.308 20.218,25.959 23.495,25.959 24.21,26.673 U2.17@24.21,27.537
CANFDTX: R44.1 U2.18 | length 15.9
  Top Layer w0.203: R44.1@18.174,17.805 17.374,17.805 16.866,18.313 16.866,19.71 19.029,21.874 19.029,24.204 20.428,25.603 23.705,25.603 24.61,26.508 U2.18@24.61,27.537
CAP1: C27.2 P2.1 R53.2 U2.12 | length 33.8
  Top Layer w0.2: v1@12.357,15.315 v1(12.357,15.265) 11.265,16.358 9.042,16.358 8.23,17.17 8.23,24.206 9.373,25.349 P2.1@10.82,25.349 14.472,25.349 18.26,29.137 U2.12@22.61,29.137
  Bottom Layer w0.2: v1(12.357,15.265) 12.357,14.643 12.827,14.173 15.672,14.173 15.951,13.894 v1(15.951,13.007)
CAP2: C26.2 P2.2 R55.2 U2.13 | length 33.8
  Top Layer w0.2: v1(13.16,15.265) 13.16,15.414 11.864,16.71 9.274,16.71 8.763,17.221 8.763,22.022 9.55,22.809 P2.2@10.82,22.809 12.43,22.809 18.358,28.737 U2.13@22.61,28.737
  Bottom Layer w0.2: v1(13.16,15.265) 13.16,14.78 13.411,14.529 16.078,14.529 16.612,13.995 16.612,12.192 v1(15.926,11.506)
CAP3: C25.2 P2.3 R56.2 U2.14 | length 33.4
  Top Layer w0.2: P2.3@10.82,20.269 11.887,20.269 13.513,21.895 13.513,23.393 18.457,28.337 U2.14@22.61,28.337 ; v1(13.964,15.265) v1@13.964,15.315 ; R56.2@15.316,9.96 v1(15.9,9.96) 16.535,9.96 C25.2@16.561,9.986
  Bottom Layer w0.2: P2.3@10.82,20.269 13.106,20.269 13.964,19.412 v1(13.964,15.265) 14.348,14.881 16.615,14.881 17.069,14.427 17.069,11.129 v1(15.9,9.96)
COMP1_REF: R47.2 R48.1 U2.5 | length 8.7
  Top Layer w0.203: R47.2@15.518,30.175 R48.1@15.518,31.725 15.742,31.948 22.598,31.948 U2.5@22.61,31.937
GHU: D1.1 Q1.4 R1.1 R6.2 | length 17.2
  Top Layer w0.381: R1.1@69.564,15.367 69.564,16.788 D1.1@70.175,17.399 70.834,17.399 73.374,19.939 80.232,19.939 80.816,19.355 Q1.4@80.816,18.796 81.375,18.796 81.794,19.215 R6.2@83.026,19.215
GHV: D2.1 Q2.4 R2.1 R7.2 | length 16.3
  Top Layer w0.381: R2.1@69.516,40.005 69.516,41.505 D2.1@70.175,42.164 70.302,42.291 80.232,42.291 80.816,41.707 Q2.4@80.816,41.124 81.732,41.124 82.175,41.567 R7.2@83.026,41.567
GHW: D3.1 Q3.4 R3.1 R8.2 | length 16.9
  Top Layer w0.254: Q3.4@80.816,48.567 Q3.4@81.174,48.567
  Top Layer w0.381: R3.1@69.564,46.101 69.564,47.522 D3.1@70.175,48.133 71.009,48.967 71.541,48.967 72.339,49.765 80.251,49.765 80.816,49.2 Q3.4@80.816,48.567 ; Q3.4@81.174,48.567 81.667,49.06 R8.2@83.026,49.06
GLU: D5.1 Q4.4 R11.1 R14.2 | length 8.4
  Top Layer w0.381: R11.1@69.564,22.225 69.564,20.804 D5.1@70.175,20.193 71.603,20.193 72.358,20.948 R14.2@72.358,21.679 72.503,21.824 Q4.4@75.184,21.824
GLV: D6.1 Q5.4 R12.1 R15.2 | length 8
  Top Layer w0.381: D6.1@70.175,27.051 69.516,27.71 R12.1@69.516,29.083 69.605,29.172 R15.2@72.358,29.172 72.453,29.267 Q5.4@75.184,29.267
GLW: D7.1 Q6.4 R13.1 R16.2 | length 7.6
  Top Layer w0.381: R13.1@69.564,53.086 69.564,51.665 D7.1@70.175,51.054 70.772,51.651 R16.2@72.358,51.651 72.414,51.595 Q6.4@75.184,51.595
GND: C1.1 C6.2 C7.1 C8.2 C10.1 C11.2 C14.1 C16.2 C17.1 C18.2 C19.1 C21.2 C22.1 C25.1 C26.1 C27.1 C28.1 C29.2 C30.1 C31.1 C32.2 CN3.4 CN3.8 CN3.10 CN3.12 CN4.2 CN7.5 DS1.2 E1.2 E2.2 NT9.2 P2.5 pad.1 Q7.2 R9.2 R10.1 R17.1 R22.1 R23.2 R25.1 R38.1 R39.2 R46.2 R47.1 R58.2 R60.1 RP1.1 RS3.1 TP7.1 U1.2 U2.0 U2.22 U2.26 U2.38 U2.42 U2.56 X1.2 X1.4 | length 61.1
  Top Layer w0.2: U2.22@26.21,27.537 26.21,25.327 v1(26.797,24.74) ; U2.26@27.81,27.537 27.81,26.546 v1(28.194,26.162) ; U2.38@29.41,31.937 32.277,31.937 32.999,32.66 v1(34.163,32.66) 35.492,32.66 C1.1@36.373,33.541 36.894,34.061 C6.2@38.227,34.061 ; U2.42@29.41,33.537 29.838,33.537 31.877,35.577 31.877,36.364 32.275,36.762
  Top Layer w0.203: C8.2@20.676,36.199 22.323,36.199 23.41,35.112 U2.56@23.41,34.337
  Top Layer w0.254: RS3.1@61.944,15.696 61.995,15.747 v6(61.995,17.018)
  Top Layer w0.3: C32.2@19.774,16.358 20.104,16.688 U1.2@21.73,16.688 ; C17.1@22.327,23.647 24.083,23.647 X1.4@24.097,23.634 25.095,24.632 v1(25.095,24.689) ; CN4.2@25.298,54.61 27.267,52.641 C7.1@27.267,48.819 ; v1(26.297,20.973) X1.2@26.297,21.934 29.567,21.934 C16.2@29.667,22.035 ; 32.275,36.762 32.275,36.974 ; 32.275,40.272 32.275,36.974 ; 38.27,36.974 32.275,36.974
  S2 w0.3: v1(28.194,26.162) 29.261,27.229 29.261,29.54 32.258,32.537 34.061,32.537 34.184,32.66 v1(34.163,32.66)
  Bottom Layer w0.254: v6(61.995,17.018) 62,17.023 NT9.2@62,18.034
  other v1: 19.202,11.405 26.01,11.735 22.86,12.802 38.811,14.376 23.393,16.688 37.338,17.526 22.809,19.304 28.981,21.006 27.915,21.031 20.396,21.234 24.858,29.693 25.696,29.693 26.56,29.693 27.398,29.693 11.532,30.15 24.858,30.539 25.705,30.539 26.551,30.539 27.398,30.539 24.858,31.386 25.705,31.386 26.551,31.386 27.398,31.386 24.858,32.233 25.705,32.233 26.551,32.233 27.398,32.233 41.199,34.722 21.463,35.331 22.276,35.331 41.199,36.017 41.199,36.957 15.799,38.456 29.312,40.005 30.759,40.005 20.472,45.491 26.187,45.618 15.316,51.486 39.446,52.299 35.763,52.375 43.155,52.4
  other v4: 71.145,1.524 72.441,1.524 83.236,1.524 84.531,1.524 71.145,2.557 72.441,2.557 83.236,2.557 84.531,2.557 71.145,3.59 72.441,3.59 83.236,3.59 84.531,3.59 71.145,4.623 72.441,4.623 83.236,4.623 84.531,4.623 56.921,13.106 58.09,13.106 56.921,14.656 58.09,14.656 56.921,16.205 58.09,16.205 53.061,53.95
  other v5: 48.768,53.302
HALLA: CN7.2 R52.2 R53.1 | length 15.6
  Bottom Layer w0.254: v7(13.1,12.982) 14.529,11.553 14.529,8.636 15.799,7.366 21.082,7.366 22.047,6.401 CN7.2@22.047,4.135
HALLB: CN7.3 R51.2 R55.1 | length 11.7
  Bottom Layer w0.254: v7(13.119,11.506) 14.097,10.528 14.097,8.357 15.57,6.883 18.517,6.883 19.507,5.893 CN7.3@19.507,4.135
HALLC: CN7.4 R49.2 R56.1 | length 7.2
  Top Layer w0.254: R56.1@13.716,9.96 13.716,7.95 16.967,4.699 CN7.4@16.967,4.135
  other v7: 13.119,9.96
HOU: D1.2 R1.2 TP3.1 U2.35 | length 49.3
  Top Layer w0.2: U2.35@29.41,30.737 40.789,30.737 41.529,29.997 46.304,29.997 v1(46.431,30.124)
  Top Layer w0.381: v1(46.355,23.825) 49.86,20.32 TP3.1@52,20.32 54.458,20.32 56.744,18.034 64.611,18.034 65.246,17.399 D1.2@66.825,17.399 67.532,16.692 R1.2@67.532,15.367
  Bottom Layer w0.254: v1(46.355,23.825) 46.309,23.871 46.309,29.85 46.507,30.048 v1(46.431,30.124)
HOV: D2.2 R2.2 TP4.1 U2.32 | length 51.9
  Top Layer w0.2: U2.32@29.41,29.537 39.094,29.537 39.764,28.867 43.04,28.867 43.993,27.915 v1(45.085,27.915)
  Top Layer w0.381: TP4.1@52,36.551 52,38.57 53.308,39.878 54.832,39.878 56.737,41.783 65.246,41.783 65.627,42.164 D2.2@66.825,42.164 67.484,41.505 R2.2@67.484,40.005
  Bottom Layer w0.381: v1(45.085,27.915) 45.085,35.23 46.406,36.551 TP4.1@52,36.551
HOW: D3.2 R3.2 TP5.1 U2.28 | length 59.4
  Top Layer w0.2: U2.28@28.61,27.537 28.61,27.164 29.274,26.5 44.188,26.5 v1(44.374,26.314)
  Top Layer w0.381: v1(49.682,37.363) 49.708,37.389 49.708,39.669 TP5.1@52,41.961 52,41.999 55.086,45.085 55.086,47.625 56.356,48.895 66.063,48.895 D3.2@66.825,48.133 67.532,47.426 R3.2@67.532,46.101
  Bottom Layer w0.381: v1(44.374,26.314) 44.374,35.839 v1(44.628,36.093) 45.898,37.363 v1(49.682,37.363)
LDO_IN: C18.1 R34.1 R41.1 U2.41 | length 9.8
  Top Layer w0.203: U2.41@29.41,33.137 30.038,33.137 32.41,35.509 C18.1@38.227,35.509
LIN_BUS/PWM-IN: C7.2 CN4.1 U2.40 | length 26.5
  Top Layer w0.2: U2.40@29.41,32.737 31.264,32.737 v1(31.928,33.401)
  Top Layer w0.3: CN4.1@30.378,54.61 30.378,54.158 28.867,52.646 C7.2@28.867,48.819 29.947,48.819 v1(30.759,48.006)
  S1 w0.3: v1(30.759,48.006) 30.759,43.002 31.928,41.834 v1(31.928,33.401)
LIN_EN: R10.2 U2.7 U2.39 | length 31
  Top Layer w0.203: v1(11.646,31.737) R10.2@12.624,31.737 ; v1(21.057,31.344) 21.263,31.137 U2.7@22.61,31.137 ; U2.39@29.41,32.337 32.083,32.337 32.918,33.172 v1(32.918,33.376)
  Bottom Layer w0.203: v1(11.646,31.737) 12.04,31.344 v1(21.057,31.344) 21.057,32.664 22.454,34.061 29.108,34.061 30.632,32.537 32.08,32.537 v1(32.918,33.376)
LOU: D5.2 R11.2 TP10.1 U2.30 | length 44.5
  Top Layer w0.2: U2.30@29.41,28.737 38.897,28.737 39.472,28.162 41.586,28.162 42.824,26.924 v1(48.387,26.924)
  Top Layer w0.381: TP10.1@52,25.73 52.47,25.73 54.832,23.368 54.832,22.155 57.429,19.558 64.865,19.558 65.5,20.193 D5.2@66.825,20.193 67.532,20.9 R11.2@67.532,22.225
  Bottom Layer w0.381: v1(48.387,26.924) 48.412,26.949 50.781,26.949 TP10.1@52,25.73
LOV: D6.2 R12.2 TP11.1 U2.24 | length 53.1
  Top Layer w0.2: U2.24@27.01,27.537 27.01,25.924 27.921,25.013 41.561,25.013 41.859,24.714 46.253,24.714 46.482,24.486 48.031,24.486 v1(48.057,24.511)
  Top Layer w0.381: TP11.1@52,31.14 52,28.74 52.8,27.94 53.816,27.94 54.705,27.051 D6.2@66.825,27.051 67.484,27.71 R12.2@67.484,29.083
  Bottom Layer w0.381: v1(48.057,24.511) 48.057,25.476 47.498,26.035 47.498,28.092 50.546,31.14 TP11.1@52,31.14
LOW: D7.2 R13.2 TP12.1 U2.25 | length 65.3
  Top Layer w0.2: U2.25@27.41,27.537 27.41,26.093 28.138,25.365 41.707,25.365 41.9,25.171 v1(46.939,25.171)
  Top Layer w0.305: v1(48.387,35.052) 48.107,35.332 48.107,44.297 49.276,45.466 50.387,45.466 52,47.079 TP12.1@52,47.371
  Top Layer w0.381: TP12.1@52,47.371 55.429,50.8 65.5,50.8 65.754,51.054 D7.2@66.825,51.054 67.532,51.761 R13.2@67.532,53.086
  Bottom Layer w0.305: v1(46.939,25.171) 46.817,25.294 46.817,29.062 48.387,30.632 v1(48.387,35.052)
MOTU: CN2.1 NT1.2 Q1.1 Q1.2 Q1.3 Q4.5 Q4.6 Q4.7 Q4.8 Q4.9 R6.1 R19.1 TP6.1 | length 97.2
  Top Layer w0.254: R19.1@36.614,56.604 36.614,57.823 38.227,59.436 89.916,59.436 92.043,57.309 92.043,53.626 94.488,51.181 95.853,51.181 99.155,47.879 99.155,30.702 98.453,30 CN2.1@96,30
  Top Layer w0.381: NT1.2@75.66,20.574 80.867,20.574
  other v2: 84.296,15.748 86.836,15.748 89.376,15.748 91.916,15.748 94.456,15.748 96.996,15.748 85.566,18.288 88.106,18.288 90.646,18.288 93.186,18.288 95.726,18.288 98.266,18.288 79.216,20.828 81.756,20.828 84.296,20.828 89.376,20.828 91.916,20.828 94.456,20.828 96.996,20.828 83.026,23.368 85.566,23.368 88.106,23.368 90.646,23.368 93.186,23.368 95.726,23.368 98.266,23.368 89.376,25.908 91.916,25.908 94.456,25.908 96.996,25.908 93.186,28.448 98.266,28.448
  other v3: 77.311,22.149 78.568,22.149 79.826,22.149 77.311,23.19 78.568,23.19 79.826,23.19 77.311,24.232 78.568,24.232 79.826,24.232 77.311,25.273 78.568,25.273 79.826,25.273
MOTV: CN2.2 NT2.2 Q2.1 Q2.2 Q2.3 Q5.5 Q5.6 Q5.7 Q5.8 Q5.9 R7.1 R32.1 TP8.1 | length 85.5
  Top Layer w0.254: R32.1@40.297,56.604 40.297,57.696 41.529,58.928 89.63,58.928 91.535,57.023 91.535,53.372 94.234,50.673 95.472,50.673 98.647,47.498 98.647,37.647 CN2.2@96,35
  Top Layer w0.381: NT2.2@75.667,35.814 80.747,35.814
  other v1: 79.216,28.448 81.756,28.448 84.296,28.448 86.836,28.448 83.026,30.988 85.566,30.988 88.106,30.988 84.296,33.528 86.836,33.528 89.376,33.528 91.916,33.528 96.996,33.528 80.486,36.068 83.026,36.068 85.566,36.068 90.646,36.068 93.186,36.068 84.296,38.608 86.836,38.608 89.376,38.608 91.916,38.608 85.566,41.148 88.106,41.148 90.646,41.148
  other v3: 77.311,29.642 78.568,29.642 79.826,29.642 77.311,30.683 78.568,30.683 79.826,30.683 77.311,31.725 78.568,31.725 79.826,31.725 77.311,32.766 78.568,32.766 79.826,32.766
MOTW: CN2.3 NT3.2 Q3.1 Q3.2 Q3.3 Q6.5 Q6.6 Q6.7 Q6.8 Q6.9 R8.1 R45.1 TP9.1 | length 44.9
  Top Layer w0.254: R45.1@43.98,56.604 43.98,57.569 44.831,58.42 75.533,58.42 77.716,56.237 Q6.9@77.716,53
  Top Layer w0.381: NT3.2@75.66,50.4 81.375,50.4
  other v2: 93.186,43.688 95.726,43.688 84.296,46.228 86.836,46.228 89.376,46.228 91.916,46.228 94.456,46.228 85.566,48.768 88.106,48.768 90.646,48.768 93.186,48.768 95.726,48.768 84.296,51.308 89.376,51.308 91.916,51.308 83.026,53.848 85.566,53.848 88.106,53.848 90.646,53.848 79.216,56.388 81.756,56.388 84.296,56.388 86.836,56.388 89.376,56.388
  other v3: 77.438,51.994 78.695,51.994 79.953,51.994 77.438,53.035 78.695,53.035 79.953,53.035 77.438,54.077 78.695,54.077 79.953,54.077 77.438,55.118 78.695,55.118 79.953,55.118
NetCN1_1: CN1.1 D4.1 Q7.3
  other v4: 50.166,14.426 51.461,14.426 50.166,15.459 51.461,15.459 50.166,16.492 51.461,16.492 50.166,17.525 51.461,17.525
NetD8_A: D8.A D9.A D11.A R20.1 | length 7.6
  Top Layer w0.254: R20.1@36.779,43.205 38.813,43.205 38.864,43.155 ; D8.A@38.85,39.624 38.864,39.638 D9.A@38.864,42.367 38.864,43.155 ; D11.A@38.864,45.11 38.864,43.155
NetDS1_1: DS1.1 R4.2 | length 2.2
  Top Layer w0.254: DS1.1@33.66,17.545 33.848,17.733 R4.2@33.848,19.653
NetNT4_2: NT4.2 Q5.1 Q5.2 Q5.3 R15.1 RS1.2 | length 2.5
  Top Layer w0.254: RS1.2@61.944,30.428 61.995,30.479 v5(61.995,32.131)
  Bottom Layer w0.254: v5(61.995,32.131) 62,32.136 NT4.2@62,32.893
  other v2: 60.42,32.004 63.468,32.004
  other v4: 60.554,28.321 62.014,28.321 63.475,28.321
NetNT5_2: NT5.2 Q6.1 Q6.2 Q6.3 R16.1 RS2.2 | length 2.5
  Top Layer w0.254: v6(61.995,51.689) 61.995,53.006 RS2.2@62,53.011
  Bottom Layer w0.254: v6(61.995,51.689) 62,51.684 NT5.2@62,50.546
  other v2: 57.372,53.34 58.896,53.34 56.61,54.864 58.134,54.864 59.658,54.864 61.182,54.864 62.706,54.864 64.23,54.864 57.372,56.388 58.896,56.388 60.42,56.388 61.944,56.388 63.468,56.388